# Altium PCB LLR-05 (Secondary-Board-PCB).PcbDoc
Units mm, origin at the board's own origin, x right, y up, seen from the top; angles counter-clockwise.
Board outline 50.04 x 40.13 mm, 2 copper layers (Top Layer, Bottom Layer); 21 components, 18 nets, 58 pads, 0 vias.
Unrouted connection lines stored in the file: 35.
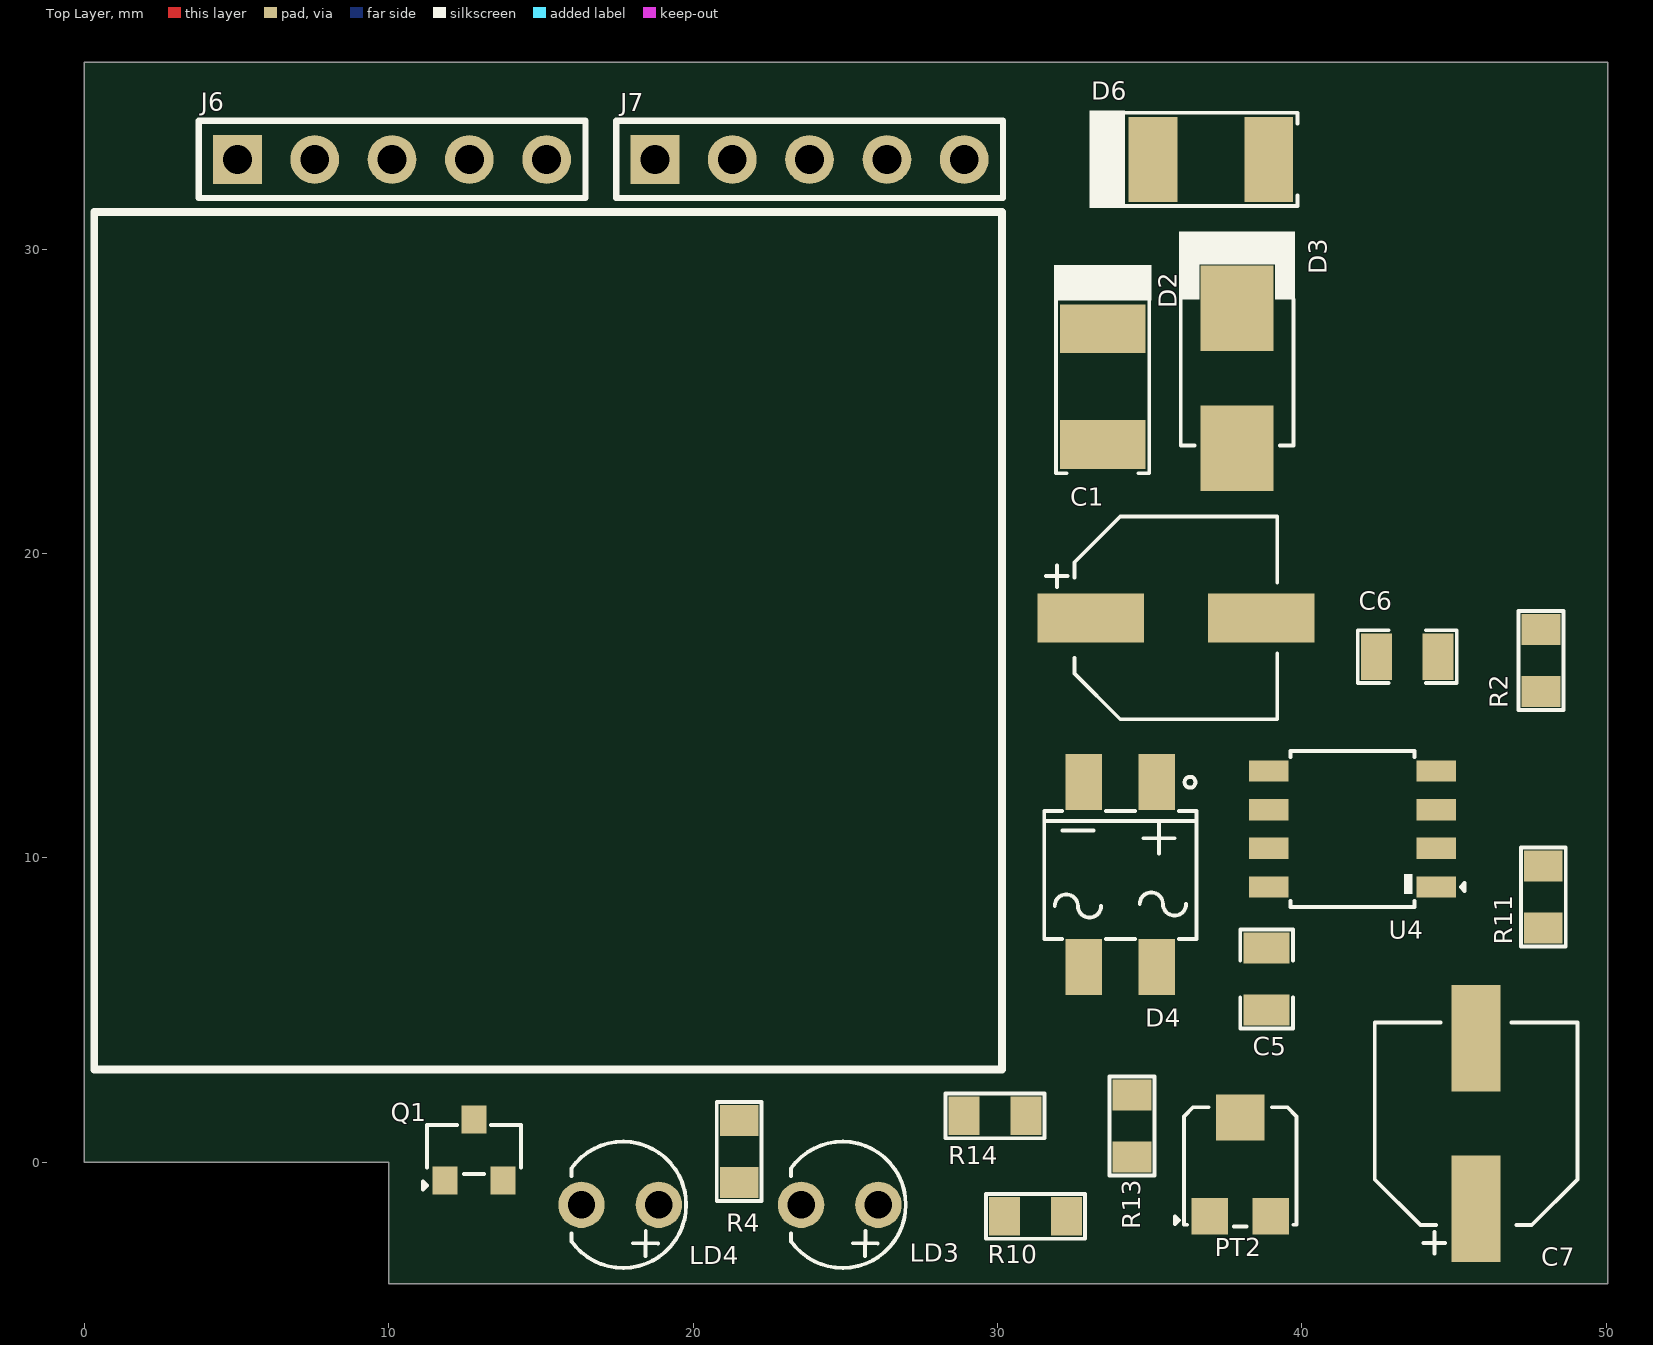
[diagram p0: Top Layer view]
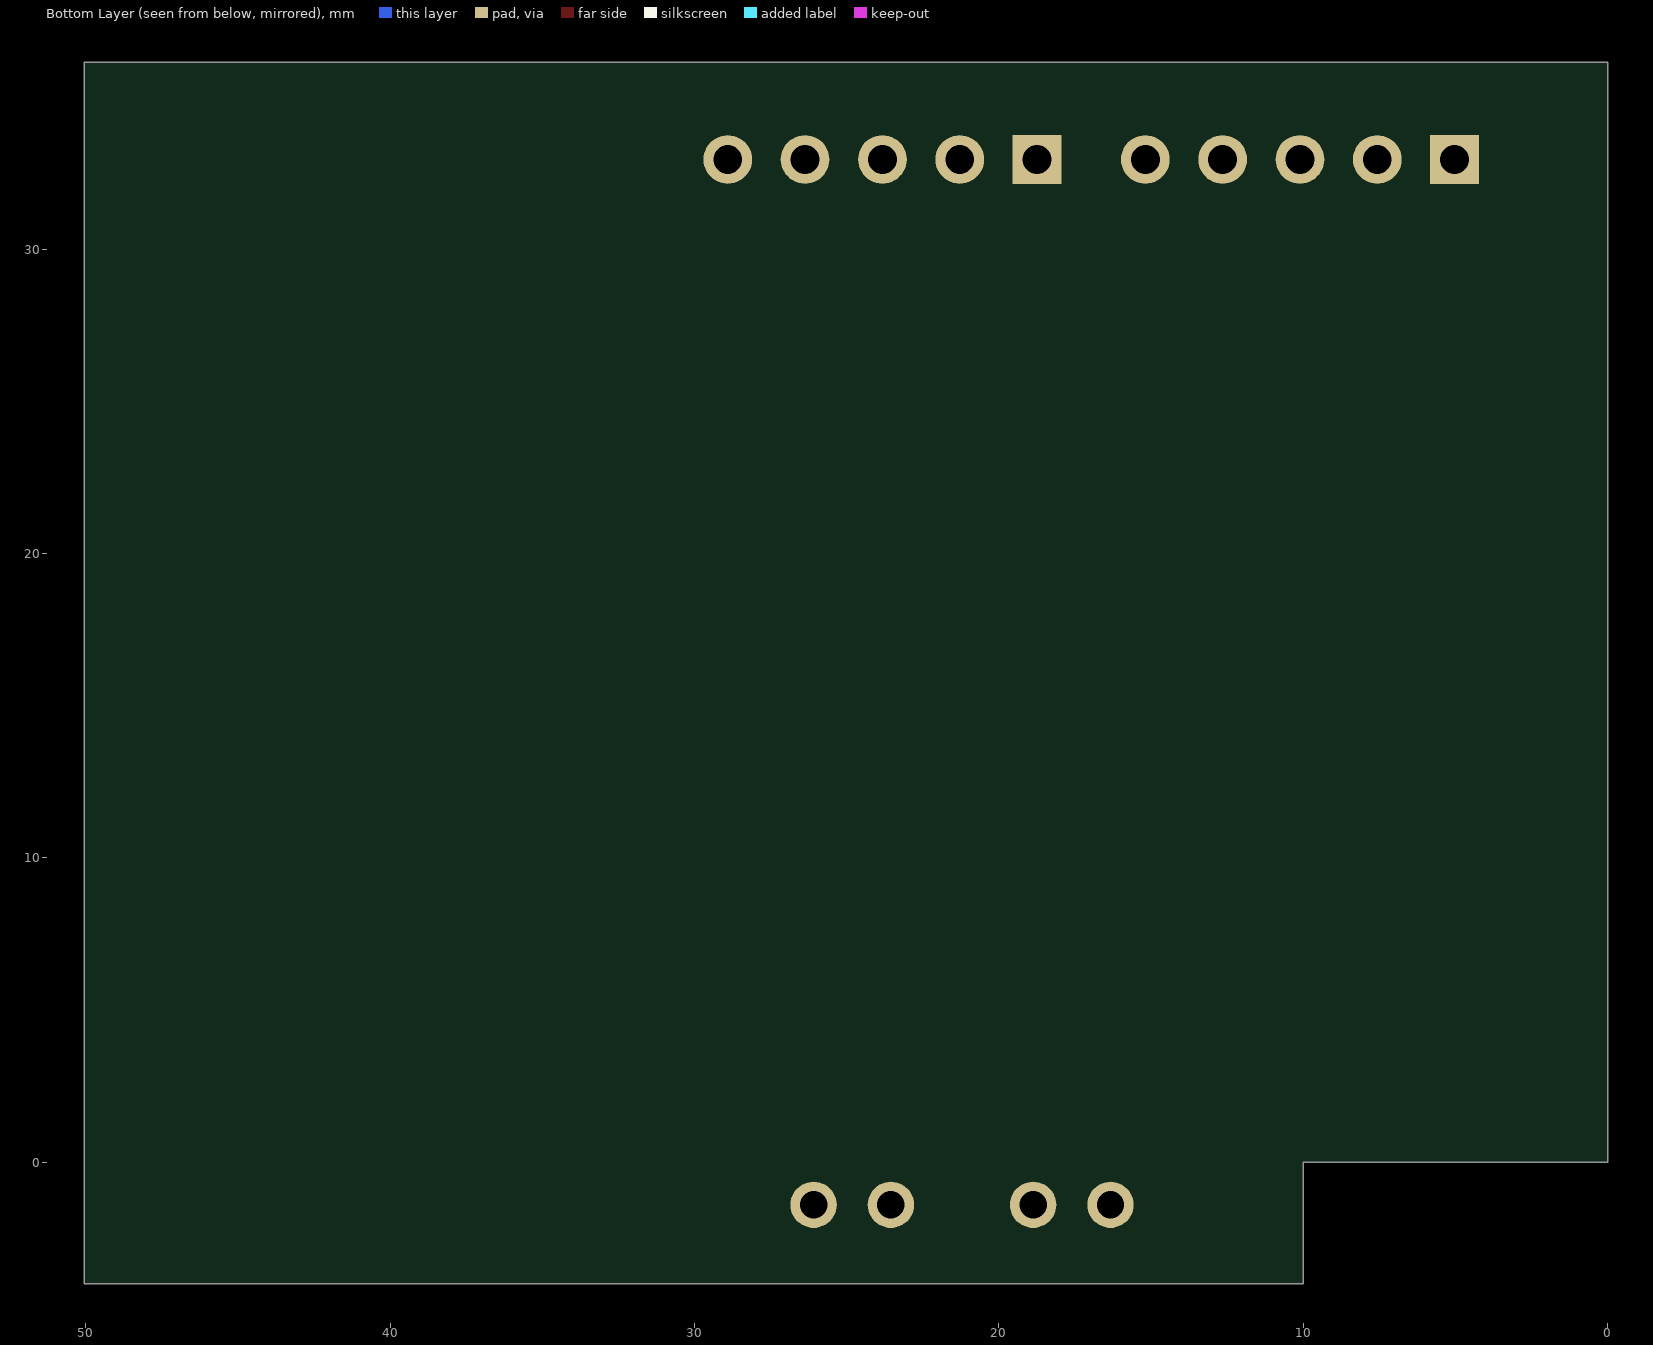
[diagram p1: Bottom Layer view, seen from below]

## Layer stack, top to bottom
Top Solder: solder mask 0.0102, Solder Resist, Dk 3.5
Top Layer: signal copper 0.0356
Dielectric 1: dielectric 0.32, FR-4, Dk 4.8
Bottom Layer: signal copper 0.0356
Bottom Solder: solder mask 0.0102, Solder Resist, Dk 3.5

## Board outline
0,0 0,36.133 50.038,36.133 50.038,-3.999 50.043,-3.999 10,-3.999 10,0

## Design rules (kind name [scope] priority, off if disabled: settings)
Clearance [All] p1: gap=0.127 ignorepadtopadclearanceinfootprint=FALSE
HoleToHoleClearance [All] p1: gap=0.127 allowstackedmicrovias=TRUE
MinimumSolderMaskSliver [All] p1: minsoldermaskwidth=0.127
PolygonConnect [All] p1: connectstyle=Relief reliefconductorwidth=0.254 reliefentries=4 polygonreliefangle="90 Angle" airgapwidth=0.254
RoutingVias [All] p1: holewidth=0.3 width=0.6 viastyle="Through Hole" minholewidth=0.3 minwidth=0.6 maxholewidth=0.3 maxwidth=0.6
SilkToSilkClearance [All] p1: silktosilkclearance=0
SilkToSolderMaskClearance [IsPad] p1: minsilkscreentomaskgap=0 clearancetoexposedcopper=TRUE
SolderMaskExpansion [All] p1: expansion=0.102 istentingtop=FALSE
UnRoutedNet [All] p1: checkbadconnections=TRUE
Width [All] p1: maxlimit=0.254 minlimit=0.254 preferedwidth=0.254
25 further rules are at their usual default settings.

## Components (designator, comment, footprint, x,y, rotation, side; value= is the part's Value field where it differs from the comment)
C1 "100uF" RVT1H101M0607 35.865,17.882 r0 top
C5 "0.1uF" Cap-0805 38.837,6.02 r90 top
C6 "0.1uF" Cap-0805 43.459,16.612 r180 top
C7 "100uF" RVT1H101M0607 45.72,1.27 r90 top
D2 "M7" SMA(DO-214AC) 33.452,25.476 r270 top
D3 "1SMB5934B" SMB_ 37.871,25.756 r90 top
D4 "MB10S" MBS10S 34.036,9.449 r270 top
D6 "M7" SMA(DO-214AC) 37.008,32.944 r0 top
J6 "C50950" "HDR 1x5 Female" 5.029,32.944 r0 top locked
J7 "C50950" "HDR 1x5 Female" 18.745,32.944 r0 top locked
LD3 "204-10SURD/S530-A3-L" "TH LED Red 3MM" 24.816,-1.397 r180 top
LD4 "Green-yellow" "TH LED Green 3MM" 17.602,-1.397 r180 top
PT2 "10K (???)" TC33X-2-103E_ 37.973,-0.152 r0 top
Q1 "MMBTA42" SOT-23 12.802,0.406 r0 top
R2 "8.2k" RES-0805 47.854,16.485 r270 top value=8.2kR
R4 "10K" RES-0805 21.514,0.356 r90 top
R10 "68K" RES-0805 31.242,-1.777 r180 top value=68kR
R11 "10K" RES-0805 47.93,8.712 r270 top
R13 "4.7K" RES-0805 34.417,1.194 r270 top
R14 "10K" RES-0805 29.917,1.524 r0 top
U4 "LM258" SOP-8 41.656,10.947 r180 top

## Footprints (in the part's own frame and the unit in brackets; to place one, negate y for a bottom-side part, rotate by r counter-clockwise, add the part's x,y. Pads: shape width x height; smd on the part's side, far side on the other; paste and mask are expansions set on the pad)
Cap-0805 [mil] "SMD 0805"
  rect 40x60 smd mask+2.76: 1(-40,0) 2(40,0)
  silkscreen extent -64,-34 64,34, body extent -39,-25 39,25, height 30
"HDR 1x5 Female" [mm]
  rect 1.6x1.6 hole 0.95: 1(0,0)
  round 1.6 hole 0.95: 2(2.54,0) 3(5.08,0) 4(7.62,0) 5(10.16,0)
  silkscreen extent -1.27,-1.27 11.43,1.27, body extent -1.3,-1.24 11.4,1.26, height 8.4
MBS10S [mm]
  rect 1.84x1.2 smd paste+0 mask+0.051: 1(-3.037,1.2) 2(-3.036,-1.2) 3(3.037,-1.2) 4(3.036,1.2)
  silkscreen extent -3.21,-2.5 2.11,2.5, body extent -3.47,-2.35 3.53,2.35, height 2.62
RES-0805 [mil] "SMD 0805"
  rect 40x50 smd: 1(-40,0) 2(40,0)
  silkscreen extent -64,-29 64,29, body extent -39,-25 39,24, height 24
RVT1H101M0607 [mm]
  rect 3.5x1.6 smd: 1(-2.8,0) 2(2.8,0)
  silkscreen extent -4.27,-3.33 3.32,3.33, body extent -3.31,-3.33 3.29,3.27, height 7.94
SMA(DO-214AC) [mm]
  rect 1.6x2.8 smd: 1(-1.9,0) 2(1.9,0)
  silkscreen extent -3.99,-1.6 2.84,1.6, body extent -2.6,-1.45 2.6,1.45, height 2.3
SMB_ [mm]
  rect 2.8x2.4 smd: 1(-2.3,0) 2(2.3,0)
  silkscreen extent -2.21,-1.91 4.82,1.91, body extent -2.7,-1.8 2.7,1.8, height 2.3
SOP-8 [mm]
  rect 1.3x0.7 smd: 1(-2.75,1.905) 2(-2.75,0.635) 3(-2.75,-0.635) 4(-2.75,-1.905) 5(2.75,-1.905) 6(2.75,-0.635) 7(2.75,0.635) 8(2.75,1.905)
  silkscreen extent -3.69,-2.57 2.03,2.57, body extent -3.1,-2.5 3.1,2.5, height 1.76
SOT-23 [mm] "TRANS NPN 40V 0.6A SOT23"
  rect 0.82x0.92 smd: 1(-0.95,-1) 2(0.95,-1) 3(0,1)
  silkscreen extent -1.68,-1.3 1.55,0.81, body extent -1.5,-1.25 1.5,1.25, height 1.05
TC33X-2-103E_ [mm]
  rect 1.2x1.2 smd: 1(-1,-1.625) 3(1,-1.625)
  rect 1.6x1.5 smd: 2(0,1.625)
  silkscreen extent -2.14,-1.96 1.85,1.96, body extent -1.8,-1.91 1.8,2.05, height 1.13
"TH LED Green 3MM" [mil]
  round 60 hole 35.43 paste+0 mask+2: 1(-50,0) 2(50,0)
  silkscreen extent -85,-82 63,82, body extent -79,-80 61,78, height 205
"TH LED Red 3MM" [mil]
  round 60 hole 35.43 paste+0 mask+2: 1(-50,0) 2(50,0)
  silkscreen extent -85,-82 63,82, body extent -79,-80 61,78, height 205

## Part data
C1 C7: library part RVT1H101M0607, "100uF 50V ±20% SMD,D6.3xL7.7mm Aluminum Electrolytic Capacitors - SMD ROHS", LCSC Part Number=C3151829, Manufacturer=ROQANG, Package=SMD,D6.3xL7.7mm, ComponentLink1Description=LCSC, ComponentLink1URL=https://www.lcsc.com/product-detail/Aluminum-Electrolytic-Capacitors-SMD_ROQANG-RVT1H101M0607_C3151829.html, Item Type=Capacitor, Manufacturer Part Number=RVT1H101M0607
C5 C6: library part C2012X7T2E104KT000N, "CAP CER 0.1UF 250V X7T 0805", LCSC Part Number=C342865, Manufacturer="TDK Corporation", Manufacturer Part Number=C2012X7T2E104K125AA, Package=0805, ComponentLink1Description=LCSC, ComponentLink1URL=https://www.lcsc.com/product-detail/Multilayer-Ceramic-Capacitors-MLCC-SMD-SMT_TDK-C2012X7T2E104KT000N_C342865.html, Item Type=Capacitor
D2 D6: "1A 1.1V@1A 1kV DO-214AC Diodes - General Purpose ROHS", LCSC Part Number=C2902910, Manufacturer=MSKSEMI, Package=DO-214AC, ComponentLink1Description=LCSC, ComponentLink1URL=https://www.lcsc.com/product-detail/Diodes-General-Purpose_MSKSEMI-M7_C2902910.html, Item Type=Diode, Manufacturer Part Number=M7
D3: "3W 24V SMB Zener Diodes ROHS", LCSC Part Number=C2988044, Manufacturer=YFW, Package=SMB, ComponentLink1Description=LCSC, ComponentLink1URL=https://www.lcsc.com/product-detail/Zener-Diodes_YFW-1SMB5934B_C2988044.html, Item Type=Diode, Manufacturer Part Number=1SMB5934B
D4: "35A 1.1V@400mA 1A 1kV MBS Bridge Rectifiers ROHS", JLCPCB Part Number=C2488, Manufacturer=MDD, Package=MBS, ComponentLink1Description=LCSC, ComponentLink1URL=https://www.lcsc.com/product-detail/Bridge-Rectifiers_MCC_MB6S-TP_MB6S-TP_C85619.html?gclid=CjwKCAjwjOunBhB4EiwA94JWsPhP5VxdRhkKtNAXxaeRo8Kbw1z5VNRY74bvbkYd4a4LtLXYHGrsEhoCPX4QAvD_BwE, Item Type="Bridge Rectifier", Manufacturer Part Number=MB10S
J6 J7: "2.54mm Plugin Straight 1x5P 5 Plugin,P=2.54mm Female Headers ROHS", Manufacturer=BOOMELE, Package=Plugin,P=2.54mm, ComponentLink1Description=LCSC, ComponentLink1URL=https://www.lcsc.com/product-detail/Female-Headers_BOOMELE-Boom-Precision-Elec-C50950_C50950.html, Item Type="Female Header", LCSC Part Number=C50950, Manufacturer Part Number=C50950
LD3: "20mA 624nm -40℃~+85℃ Red 40° 3mm圆形灯头 60mW Plugin,D=3mm Light Emitting Diodes (LED) ROHS", LCSC Part Number=C99771, Manufacturer="Everlight Elec", Package=Plugin,D=3mm, ComponentLink1Description=LCSC, ComponentLink1URL=https://www.lcsc.com/product-detail/Light-Emitting-Diodes-LED_Everlight-Elec-204-10SURD-S530-A3-L_C99771.html, Item Type=LED, Manufacturer Part Number=204-10SURD/S530-A3-L
LD4: library part 204-10SYGD/S530-E3, "LED Single Standard Yellow Green 573nm 25mA 2-Pin T-1 Bag", Case/Package=T, Forward Current=25mA, Forward Voltage=2.4V, LCSC Part Number=C85161, Manufacturer=Everlight, Max Operating Temperature=85°C, Min Operating Temperature=-40°C, Power Dissipation=60W, Reverse Voltage=5V, Supplier Part Number=1080-204-10SYGD/S530-E3TR-ND, ComponentLink1Description=https://datasheet.ciiva.com/26901/getdatasheetpartid-707371-26901329.pdf?src-supplier=Verical, ComponentLink1URL=https://datasheet.ciiva.com/26901/getdatasheetpartid-707371-26901329.pdf?src-supplier=Verical, Depth=4mm, Dominant Wavelength=573nm, Item Type=LED, Length=4mm, Lens Style=Diffused,Colored, Luminous Intensity=100mcd, Manufacturer Part Number=204-10SYGD/S530-E3, Mounting Technology="Through Hole", Number of Elements=1, Packaging="Tape and Reel", Pins=2, Pricing="3000=0.10482, 5000=0.09847, 10000=0.09212, 25000=0.08449, 50000=0.08132, 100000=0.07941 (USD)", Radiation Hardening=No, RoHS=Yes, RoHS Compliant=Yes, Supplier=Digikey, Viewing Angle=45°, Wavelength=573nm
PT2: library part TC33X-2-103E, "TRIMMER 10K OHM 0.1W J LEAD TOP", Color=Silver, LCSC Part Number=C719176, Manufacturer=Bourns, Max Operating Temperature=100°C, Max Power Dissipation=100mW, Min Operating Temperature=-40°C, Package Quantity=1, Resistance=10kR, Resistance Tolerance=25%, Resistor Type=Cermet, Supplier Part Number 1=4617135P, Temperature Coefficient=250ppm/°C, Voltage Rating (DC)=50V, Category="Variable Resistors and Potentiometers", ComponentLink1Description=https://datasheet.ciiva.com/11830/0900766b802749b3-11830705.pdf?src-supplier=Rs, ComponentLink1URL=https://datasheet.ciiva.com/11830/0900766b802749b3-11830705.pdf?src-supplier=Rs, ComponentLink2Description=https://datasheet.ciiva.com/7953/1818686-7953349.pdf?src-supplier=Element14, ComponentLink2URL=https://datasheet.ciiva.com/7953/1818686-7953349.pdf?src-supplier=Element14, ComponentLink3Description=https://datasheet.ciiva.com/26944/getdatasheetpartid-183773-26944166.pdf?src-supplier=Verical, ComponentLink3URL=https://datasheet.ciiva.com/26944/getdatasheetpartid-183773-26944166.pdf?src-supplier=Verical, ComponentLink4Description=https://datasheet.ciiva.com/2155/tc33-2155962.pdf?src-supplier=Digi-Key, ComponentLink4URL=https://datasheet.ciiva.com/2155/tc33-2155962.pdf?src-supplier=Digi-Key, ComponentLink5Description=https://datasheet.ciiva.com/2155/tc33-2155963.pdf?src-supplier=Digi-Key, ComponentLink5URL=https://datasheet.ciiva.com/2155/tc33-2155963.pdf?src-supplier=Digi-Key, ComponentLink6Description=https://datasheet.ciiva.com/2155/tc33-2155964.pdf?src-supplier=Digi-Key, ComponentLink6URL=https://datasheet.ciiva.com/2155/tc33-2155964.pdf?src-supplier=Digi-Key, ComponentLink7Description=https://datasheet.ciiva.com/8089/tc33-8089484.pdf?src-supplier=Avnet, ComponentLink7URL=https://datasheet.ciiva.com/8089/tc33-8089484.pdf?src-supplier=Avnet, ComponentLink8Description=https://datasheet.ciiva.com/28659/1520225-28659212.pdf?src-supplier=Element14, ComponentLink8URL=https://datasheet.ciiva.com/28659/1520225-28659212.pdf?src-supplier=Element14, Contact Plating=Copper,Tin,Silver, Depth=3.8mm, Height=0.047inch, Item Type=Potentiometer, Lead Free="Lead Free", Length=3mm, Manufacturer Part Number=TC33X-2-103E, Military Standard=Not, Mount="Surface Mount", Number of Turns=1, Packaging="Tape and Reel", Power Rating=100mW, Pricing 1="500=0.24400, 1000=0.22000, 2000=0.19700, 4000=0.17300 (GBP)", Radiation Hardening=No, Reach SVHC Compliant=Yes, RoHS=Yes, RoHS Compliant=Yes, Series=TC33, Stock 1=950, Supplier 1=Rs, Taper=Linear, Termination="Foot Print", Tolerance=25%, Weight=29.4mg, Width=0.118inch
Q1: "300V 350mW 100@10mA,10V 300mA NPN SOT-23 Bipolar Transistors - BJT ROHS", LCSC Part Number=C181172, Manufacturer="Guangdong Hottech", Package=SOT-23, ComponentLink1Description=LCSC, ComponentLink1URL=https://www.lcsc.com/product-detail/Bipolar-Transistors-BJT_Guangdong-Hottech-MMBTA42_C181172.html, Item Type=Transistor, Manufacturer Part Number=MMBTA42
R2: library part 0805W8F8201T5E, "125mW Thick Film Resistors 150V ±100ppm/℃ ±1% 8.2kΩ 0805 Chip Resistor - Surface Mount ROHS", LCSC Part Number=C17828, Manufacturer="Royal Electronic Factory", Supplier Part Number=303-0805W8F8201T5E, Item Type=Resistor, Manufacturer Part Number=0805W8F8201T5E, Pricing="10000=0.002 (USD)", RoHS=No, Supplier=Mouser
R4 R11 R14: library part RC0805FR-7W10KL, "RES 10K OHM 1% 1/4W 0805", LCSC Part Number=C723404, Manufacturer=Yageo, Supplier Part Number=49AK3472, Category="Chip SMD Resistors", Item Type=Resistor, Manufacturer Part Number=RC0805FR-7W10KL, Pricing="1=0.153, 25=0.038, 50=0.03, 100=0.02 (USD)", RoHS=Yes, Stock=5000, Supplier=Avnet
R10: library part 0805W8F6802T5E, "125mW Thick Film Resistors 150V ±100ppm/℃ ±1% 68kΩ 0805 Chip Resistor - Surface Mount ROHS", LCSC Part Number=C17801, Manufacturer="Royal Electronic Factory", Supplier Part Number=303-0805W8F6802T5E, Item Type=Resistor, Manufacturer Part Number=0805W8F6802T5E, Pricing="10000=0.002 (USD)", RoHS=Yes, RoHS Compliant=Yes, Stock=85000, Supplier=Mouser
R13: library part CRCW08054K70FKEAHP, "RES SMD 4.7K OHM 1% 1/2W 0805", Case Code (Imperial)=0805, Case Code (Metric)=2012, LCSC Part Number=C313926, Manufacturer=Vishay, Max Operating Temperature=155°C, Max Power Dissipation=500mW, Min Operating Temperature=-55°C, Package Quantity=5000, Power Rating=330mW, Ratings=AEC-Q200, Resistance=4.7kR, Resistance Tolerance=1%, Resistor Type="Thick Film", Supplier Part Number 1=8123574, Temperature Coefficient=100ppm/°C, Voltage Rating=150V, Case/Package=0805, Category="Chip SMD Resistors", ComponentLink1Description=https://datasheet.ciiva.com/8079/424479-8079653.pdf?src-supplier=Element14, ComponentLink1URL=https://datasheet.ciiva.com/8079/424479-8079653.pdf?src-supplier=Element14, ComponentLink2Description=https://datasheet.ciiva.com/9072/crcwhpe3-9072073.pdf?src-supplier=Avnet, ComponentLink2URL=https://datasheet.ciiva.com/9072/crcwhpe3-9072073.pdf?src-supplier=Avnet, Construction=Rectangular, Contact Plating=Tin, Depth=1.25mm, Features="Automotive AEC-Q200", Height=0.5mm, Item Type=Resistor, Lead Free="Lead Free", Length=2mm, Manufacturer Part Number=CRCW08054K70FKEAHP, Military Standard=Not, Mount="Surface Mount", Number of Terminations=2, Packaging="Tape and Reel", Pricing 1="25=0.16800, 100=0.15700, 250=0.14600, 500=0.13600, 1000=0.12500 (GBP)", Radiation Hardening=No, RoHS=Yes, RoHS Compliant=Yes, Series=CRCW-HP, Stock 1=5000, Supplier 1=RSComponents, Technology="THICK FILM", Termination=SMD/SMT, Tolerance=1%, Voltage Rating (DC)=150V, Weight=0.000194oz, Width=1.2mm
U4: "Dual 250nA 5mV SOP-8 Operational Amplifier ROHS", LCSC Part Number=C6851436, Manufacturer="HXY MOSFET", Package=SOP-8, ComponentLink1Description=LCSC, ComponentLink1URL=https://www.lcsc.com/product-detail/Operational-Amplifier_HXY-MOSFET-LM258_C6851436.html, Item Type=Opam, Manufacturer Part Number=LM258

## Nets (pads, with @x,y where several pads share a name; then routed paths per layer and width w, separated by ;. In a path a pad name is that pad's centre, name@x,y a point inside that pad or via, vN(x,y) a via of type N, cw(c..) or ccw(c..) an arc to the next point about the centre after c; other vN are vias at no path point)
GND: C1.2 C5.1 C6.1 C7.2 D3.1 D4.2 J7.1 Q1.2 R2.1 R13.1 R14.2 U4.4
J6-3: C6.2 D6.2 J6.3 U4.3
NetC5_2: C5.2 D2.1 D3.2 D6.1 U4.8
NetC7_1: C7.1 Q1.1 R2.2 R11.1
NetD4_3: D4.3
NetD4_4: D4.4
NetJ6_1: J6.1
NetJ6_4: J6.4
NetJ6_5: J6.5
NetJ7_2: J7.2 Q1.3 R4.2
NetJ7_5: J7.5
NetLD3_2: LD3.2 R14.1
NetLD4_2: LD4.2 R4.1
NetPT2_1: PT2.1 R10.1
NetPT2_2: PT2.2 U4.2
NetPT2_3: PT2.3 R13.2
NetR11_2: R11.2 U4.1
VCC: C1.1 D2.2 D4.1 J7.3 LD3.1 LD4.1 R10.2
pads on no net: J6.2 J7.4 U4.5 U4.6 U4.7

## Silkscreen, mask and mechanical layers (free items; w line width, h text height)
Top Overlay:
  lines w0.254: 0.33,3.048 30.15,3.048 30.15,31.217 0.33,31.217 0.33,3.048
Board Outline:
  lines w0.254: 10,0 0,0 0,21.946 0,36.133 50.038,36.133 50.038,-3.999 ; 10,0.001 10,-3.999 50.043,-3.999